# Altium PCB TYH-PD67W 2C1A 屏板0722.pcbdoc
Units mm, origin at the board's own origin, x right, y up, seen from the top; angles counter-clockwise.
Board outline 22.99 x 38.9 mm, 5 copper layers (Top Layer, Signal Layer 3, Signal Layer 1, Signal Layer 2, Bottom Layer), stack 0.941 mm thick; 41 components, 178 nets, 155 pads, 222 vias.
Unrouted connection lines stored in the file: 1.
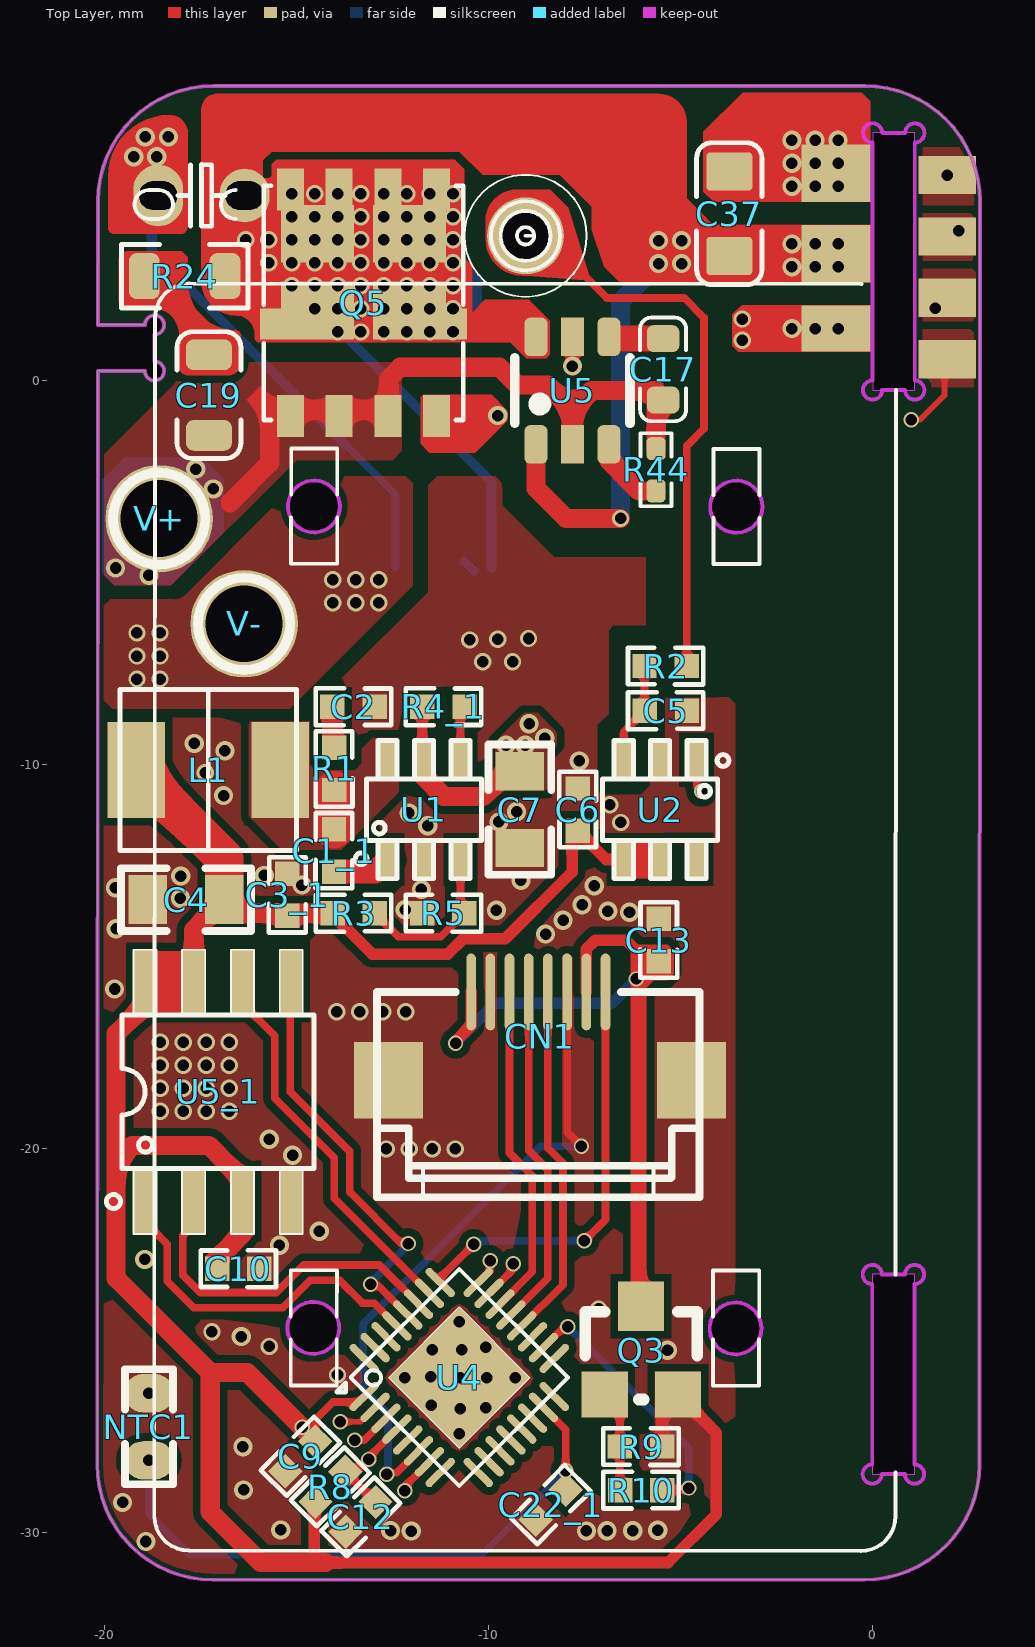
[diagram p0: Top Layer view]
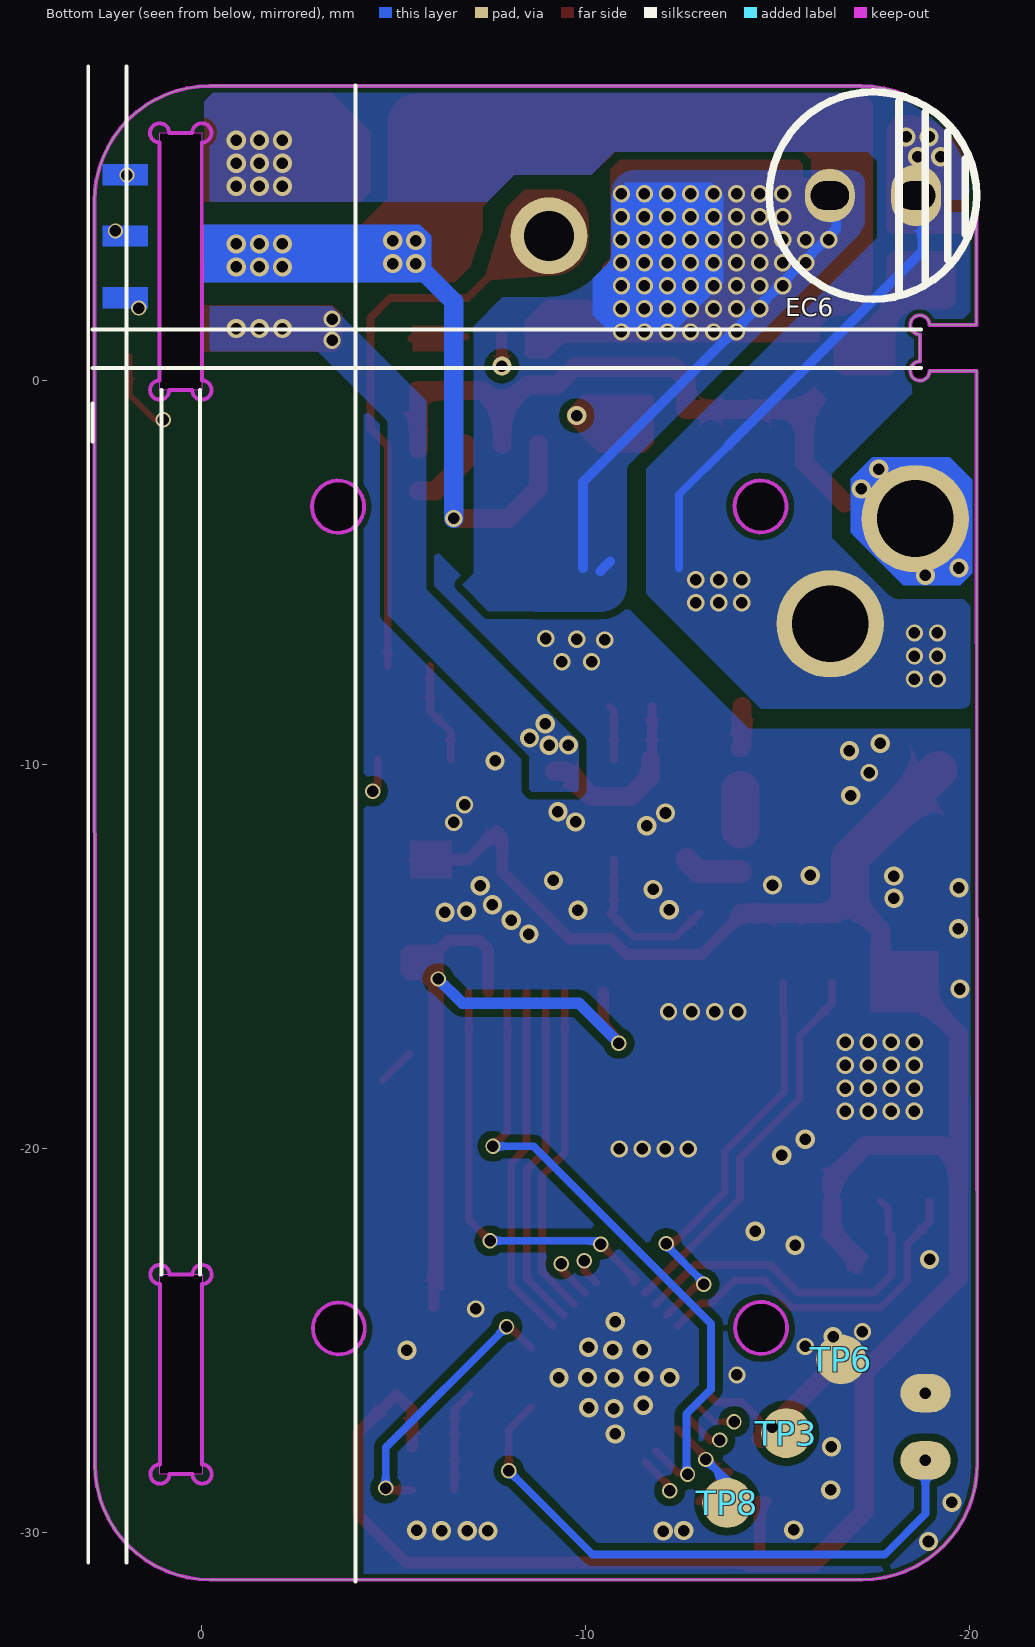
[diagram p1: Bottom Layer view, seen from below]
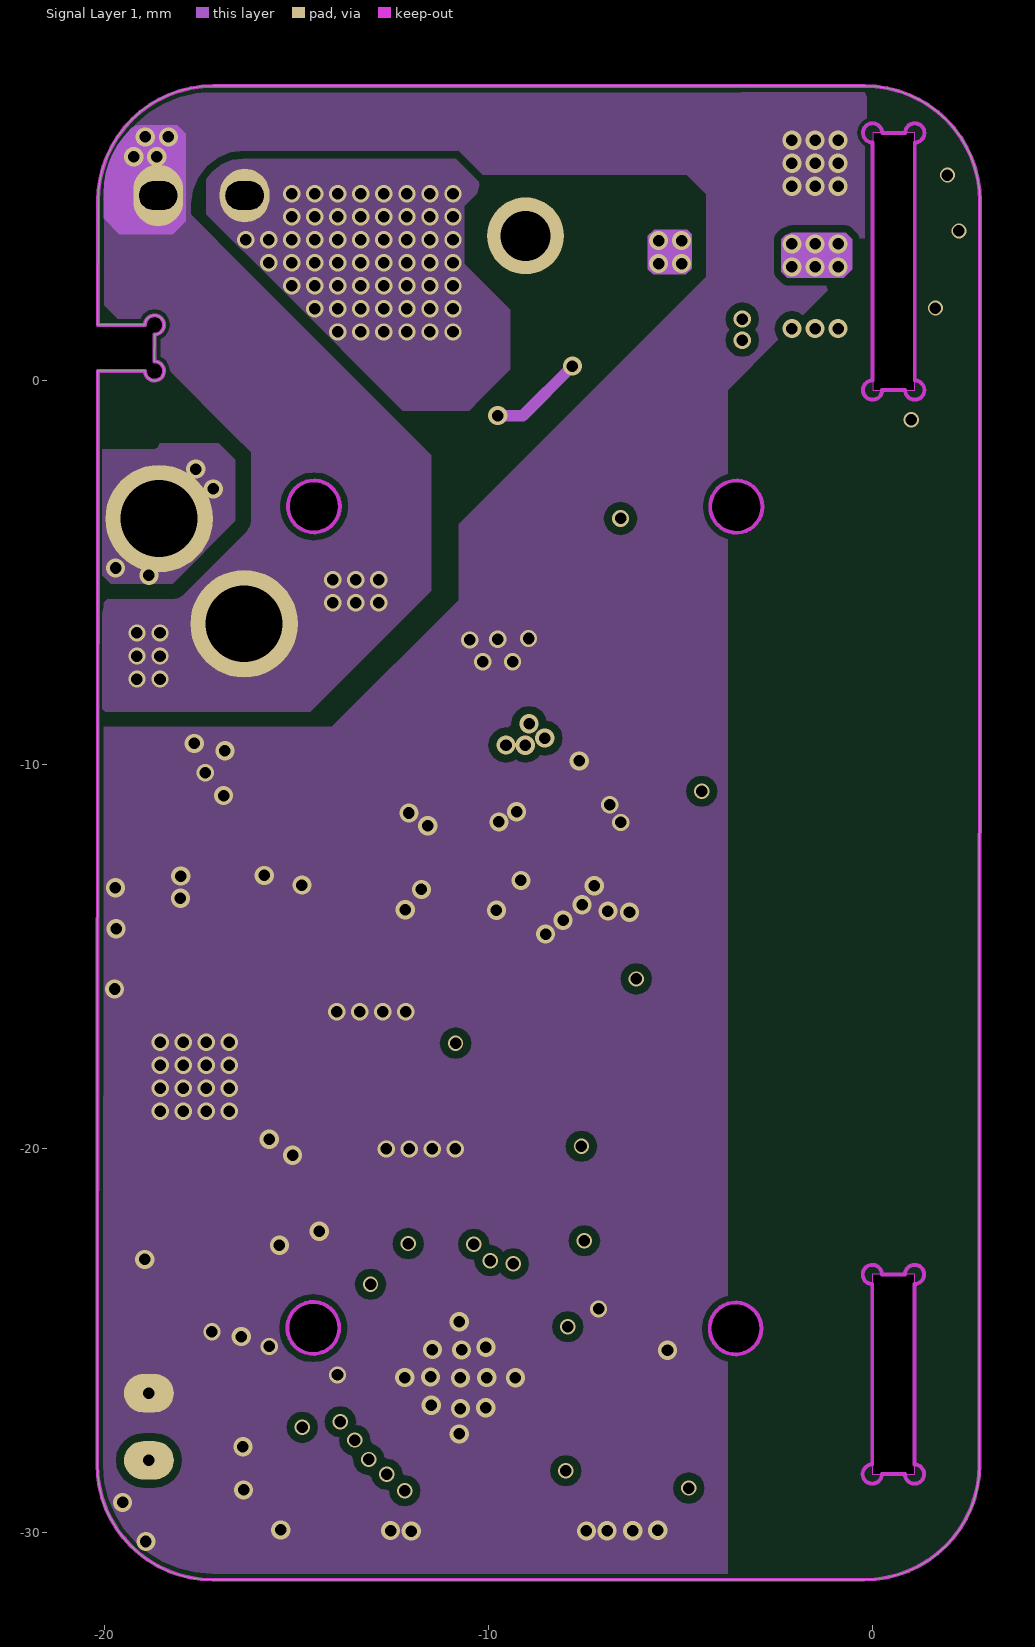
[diagram p2: Signal Layer 1]
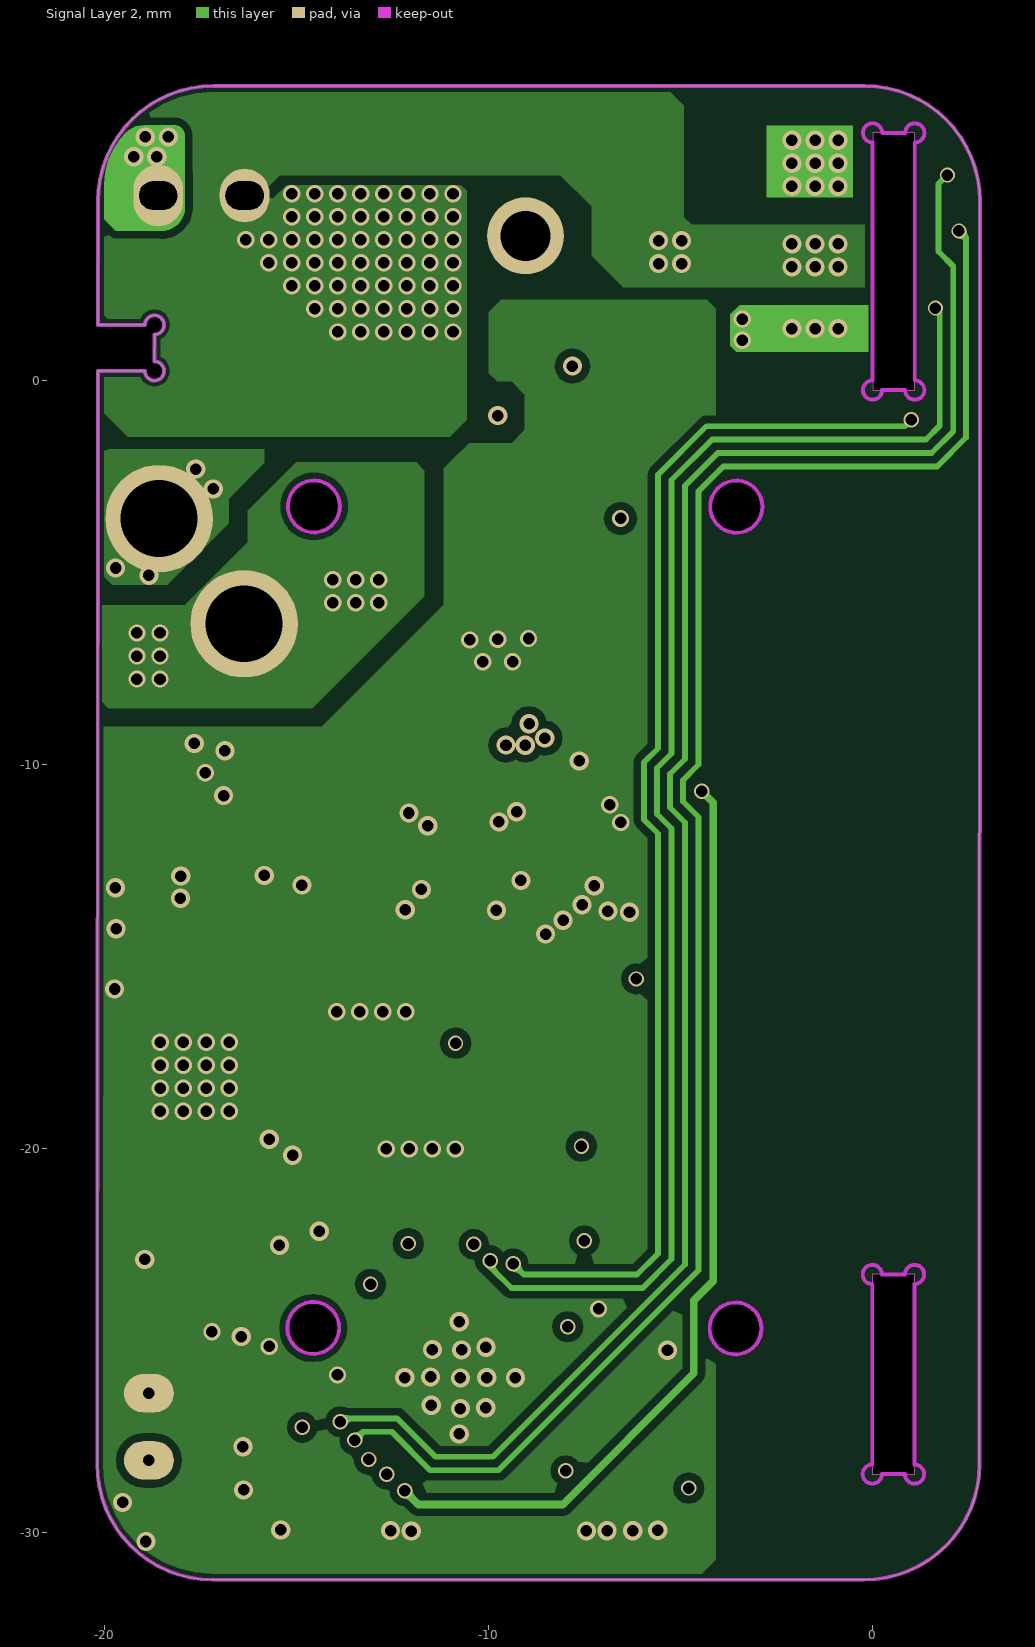
[diagram p3: Signal Layer 2]
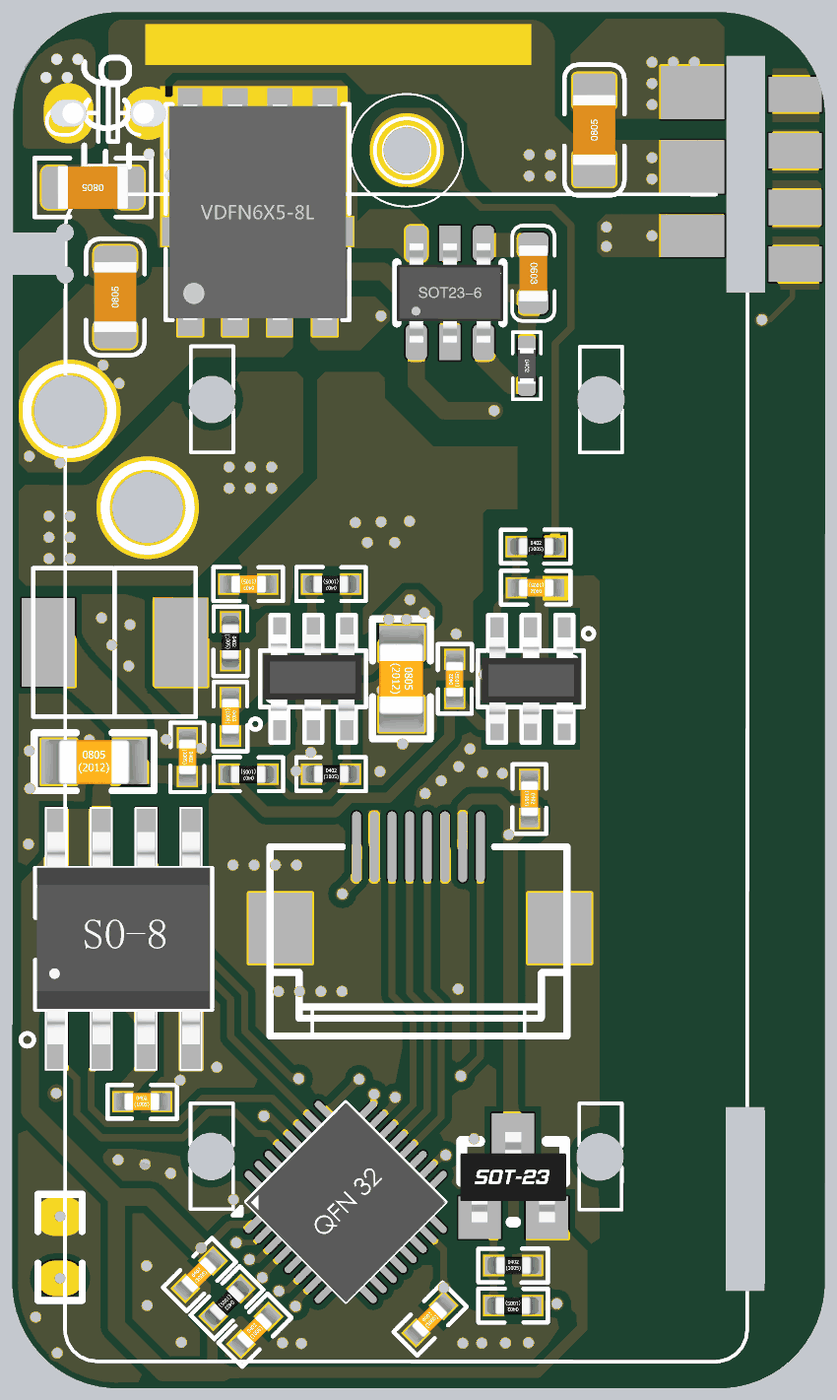
[diagram p4: 3D render of the assembled board from above, using the file's embedded part models]

## Layer stack, top to bottom
Top Solder: solder mask 0.0102, Solder Resist, Dk 3.5
Top Layer: signal copper 0.0356
Dielectric 1: core 0.254, FR-4, Dk 4.2
Signal Layer 3: signal copper 0.036
Dielectric 4: prepreg 0.127, Dk 4.2
Signal Layer 1: signal copper 0.036
Dielectric 2: core 0.254, Dk 4.2
Signal Layer 2: signal copper 0.036
Dielectric 3: prepreg 0.127, Dk 4.2
Bottom Layer: signal copper 0.0356
Bottom Solder: solder mask 0.0102, Solder Resist, Dk 3.5

## Board outline
-20.192,-28.232 ccw(c-17.192,-28.234) -17.192,-31.234 -0.214,-31.234 ccw(c-0.214,-28.234) 2.786,-28.235 2.798,4.669 ccw(c-0.202,4.67) -0.202,7.67 -17.171,7.67 ccw(c-17.171,4.67) -20.171,4.672 -20.173,1.447 -18.95,1.447 cw(c-18.7,1.447) -18.7,1.197 -18.7,0.497 cw(c-18.7,0.247) -18.95,0.247 -20.174,0.247
cut-out: 1.094,-23.283 -0.006,-23.283 -0.006,-28.483 1.094,-28.483
cut-out: 0.001,-0.25 1.101,-0.25 1.101,6.45 0.001,6.45
cut-out: -13.894,-24.676 -13.894,-24.675 ccw(c-14.561,-24.675) -14.561,-24.009 -14.571,-24.009 ccw(c-14.571,-24.673) -15.236,-24.673 -15.236,-24.702 ccw(c-14.584,-24.702) -14.584,-25.353 -14.571,-25.353 ccw(c-14.571,-24.676)
cut-out: -2.898,-24.69 -2.898,-24.689 ccw(c-3.565,-24.689) -3.565,-24.022 -3.575,-24.022 ccw(c-3.575,-24.687) -4.239,-24.687 -4.239,-24.715 ccw(c-3.588,-24.715) -3.588,-25.367 -3.575,-25.367 ccw(c-3.575,-24.69)
cut-out: -13.871,-3.273 -13.871,-3.272 ccw(c-14.537,-3.272) -14.537,-2.606 -14.547,-2.606 ccw(c-14.547,-3.27) -15.212,-3.27 -15.212,-3.299 ccw(c-14.56,-3.299) -14.56,-3.95 -14.548,-3.95 ccw(c-14.548,-3.273)
cut-out: -2.871,-3.279 -2.871,-3.278 ccw(c-3.537,-3.278) -3.537,-2.612 -3.547,-2.612 ccw(c-3.547,-3.276) -4.212,-3.276 -4.212,-3.305 ccw(c-3.56,-3.305) -3.56,-3.956 -3.548,-3.956 ccw(c-3.548,-3.279)

## Design rules (kind name [scope] priority, off if disabled: settings)
Clearance Clearance_22 [InNet('HV') vs InNet('SW')] p1: gap=1.2
Clearance Clearance_21 [InNet('NetRX3_2') vs InNet('PGND')] p2: gap=1.5
Clearance Clearance_20 [InNet('NetBD1_1') vs InNet('PGND')] p3: gap=1.5
Clearance Clearance_19 [InNet('NetC4_2') vs InNet('PGND')] p4: gap=0.4
Clearance Clearance_18 [InNet('NetR15_1') vs InNet('PGND')] p5: gap=1
Clearance Clearance_17 [InNet('NetN_1') vs InNet('NetBD1_1')] p6: gap=1.55
Clearance Clearance_16 [InNet('NetN_1') vs InNet('PGND')] p7: gap=1.5
Clearance Clearance_15 [InNet('VIN') vs InNet('PGND')] p8 off: gap=5.8
Clearance Clearance_14 [InNet('CS') vs InNet('Bais-L')] p9: gap=0.45
Clearance Clearance_13 [InNet('SW') vs InNet('CS')] p10: gap=1.5
Clearance Clearance_12 [InNet('NetR15_1') vs InNet('CS')] p11: gap=1
Clearance Clearance_11 [InNet('NetBD1_3') vs InNet('CS')] p12: gap=1.1
Clearance Clearance_10 [InNet('HV') vs InNet('CS')] p13: gap=1.1
Clearance Clearance_9 [InNet('NetL2_1') vs InNet('CS')] p14: gap=1.5
Clearance Clearance_8 [InNet('NetC1_2') vs InNet('PGND')] p15: gap=1.2
Clearance Clearance_7 [InNet('NetBD1_3') vs InNet('PGND')] p16: gap=1.2
Clearance Clearance_6 [InNet('NetC2_2') vs InNet('PGND')] p17: gap=1.3
Clearance Clearance_5 [InNet('Bais-L') vs InNet('PGND')] p18: gap=0.45
Clearance Clearance_4 [InNet('SW') vs InNet('PGND')] p19: gap=1.5
Clearance Clearance_3 [InNet('HV') vs InNet('PGND')] p20: gap=1.2
Clearance Clearance_2 [InNet('NetL2_1') vs InNet('PGND')] p21: gap=1.5
Clearance Clearance_1 [OnLayer('Keep-Out Layer')] p22: gap=0.1
Clearance [All] p23: gap=0.2
PlaneConnect [All] p1: planeconnectstyle=Direct reliefexpansion=0.508 reliefentries=4 reliefconductorwidth=0.3 reliefairgap=0.254
PolygonConnect [All] p1: connectstyle=Direct reliefconductorwidth=0.3 reliefentries=4 polygonreliefangle="90 Angle" airgapwidth=0.3
RoutingVias [All] p1: holewidth=0.711 width=1.27 viastyle="Through Hole" minholewidth=0.711 minwidth=1.27 maxholewidth=0.711 maxwidth=1.27
SolderMaskExpansion [All] p1: expansion=0.05
Width [All] p1: maxlimit=10 minlimit=0.1 preferedwidth=0.2
28 further rules are at their usual default settings.

## Components (designator, comment, footprint, x,y, rotation, side; value= is the part's Value field where it differs from the comment)
C1_1 "100nF" 0402C#1 -14.001,-12.224 r270 top (schematic designator C1)
C2 "1NF" 0402C#1 -13.499,-8.522 r180 top
C3_1 "100NF" 0402C#1 -15.218,-13.374 r270 top (schematic designator C3)
C4 "22uF" 0805C#1 -17.955,-13.505 r0 top
C5 "10PF" 0402C#2 -5.364,-8.624 r180 top
C6 "105P" 0402C#1 -7.701,-11.199 r90 top
C7 "10uF" 0805C#1 -9.169,-11.101 r270 top
C9 "100NF" 0402C#1 -14.935,-28.019 r45 top
C10 "105PF" 0402C#1 -16.539,-23.112 r0 top
C12 "100NF" 0402C#1 -13.364,-29.594 r45 top
C13 "105P" 0402C#1 -5.544,-14.553 r270 top
C17 "2.2nF/250V/0805" 0603CX -5.454,1.088 r270 top (schematic designator C10)
C19 "2.2nF/250V/0805" 0805CX -17.282,-1.432 r90 top (schematic designator C10)
C22_1 "100NF" 0402C#1 -8.41,-29.279 r45 top (schematic designator C22)
C37 "2.2nF/250V/0805" 0805C#2 -4.58,2.492 r90 top (schematic designator C10)
CN1 "8.07A0.006200" "70W 屏座" -8.756,-16.05 r270 top locked
EC6 "560uF/25V/6.3*16" EG-5*17L -17.478,4.815 r90 bottom
L1 "4.7uH" 电感0420 -17.301,-10.146 r180 top
NTC1 "100K" NTC1 -18.845,-27.286 r90 top
Q3 "APM2301" SOT23-MOS -6.109,-25.751 r0 top
Q5 "Comment" DFN5*6 -15.163,-0.929 r0 top
R1 "2R" 0402R#1 -14,-10.094 r270 top
R2 "0R" 0402R#2 -5.408,-7.414 r0 top
R3 "47k" 0402R#1 -13.491,-13.898 r180 top
R4_1 "100k" 0402R#1 -11.155,-8.522 r180 top (schematic designator R4)
R5 "12k" 0402R#1 -11.199,-13.849 r0 top
R8 "10k" 0402R#1 -14.089,-28.812 r225 top
R9 "100K" 0402R#1 -6.048,-27.741 r0 top
R10 "1K" 0402R#1 -6.004,-28.921 r180 top
R24 "10R/1206" 0805RX -16.865,2.715 r180 top (schematic designator R6)
R44 "51R/0402" 0402R#3 -5.639,-1.776 r270 top (schematic designator R9)
TP3 "V3V" 焊盘1.5*2.5mm -15.218,-27.415 r180 bottom
TP6 "GND" 焊盘1.5*2.5mm -16.647,-25.494 r180 bottom
TP8 "RST" 焊盘1.5*2.5mm -13.681,-29.234 r180 bottom
U1 "ME3121" SOT23-6 -11.668,-11.179 r90 top
U2 "HD9210" SOT23-6 -5.544,-11.174 r270 top
U4 "PY32F032" "QFN32 4*4" -13.237,-26.462 r315 top
U5 "Comment" SOT-23-6S -8.766,-1.664 r90 top
U5_1 "P25Q64H-SUH-IT" SOP8 -17.119,-18.501 r90 top (schematic designator U5)
V+ "Comment" PAD-AC -18.58,-3.598 r0 top
V- "Comment" PAD-AC -16.366,-6.338 r0 top

## Footprints (in the part's own frame and the unit in brackets; to place one, negate y for a bottom-side part, rotate by r counter-clockwise, add the part's x,y. Pads: shape width x height; smd on the part's side, far side on the other; paste and mask are expansions set on the pad)
"70W 屏座" [mm]
  oval 2x0.25 smd: 1(-0.124,-1.698) 2(-0.124,-1.198) 3(-0.124,-0.698) 4(-0.124,-0.198) 5(-0.124,0.302) 6(-0.124,0.802) 7(-0.124,1.302) 8(-0.124,1.802)
  rect 2x1.8 smd: 2(2.176,-3.855) 2(2.176,4.045)
  silkscreen extent -0.12,-4.15 5.23,4.25
0402C#1 [mm]
  rect 0.635x0.635 smd paste-0.067 mask-0.018: 1(-0.531,-0.023) 2(0.571,-0.023)
  silkscreen extent -0.96,-0.51 1,0.46, body extent -0.72,-0.27 0.74,0.23, height 0.51
0402C#2 [mm]
  rect 0.635x0.635 smd paste-0.067: 1(-0.531,-0.023)
  rect 0.635x0.635 smd paste-0.067 mask-0.018: 2(0.571,-0.023)
  silkscreen extent -0.96,-0.51 1,0.46, body extent -0.72,-0.27 0.74,0.23, height 0.51
0402R#1 [mm]
  rect 0.635x0.635 smd paste-0.067 mask-0.018: 1(-0.531,-0.023) 2(0.571,-0.023)
  silkscreen extent -0.96,-0.51 1,0.46, body extent -0.7,-0.27 0.76,0.23, height 0.51
0402R#2 [mm]
  rect 0.635x0.635 smd paste-0.067 mask-0.018: 1(-0.531,-0.023)
  rect 0.635x0.635 smd paste-0.067: 2(0.571,-0.023)
  silkscreen extent -0.96,-0.51 1,0.46, body extent -0.7,-0.27 0.76,0.23, height 0.51
0402R#3 [mm]
  rrect50% 0.6x0.5 smd: 1(0,0) 2(1.1,0)
  silkscreen extent -0.4,-0.4 1.5,0.4, body extent 0.05,-0.25 1.05,0.25, height 0.3
0603CX [mm]
  rrect50% 0.7x0.85 smd: 1(0,0) 2(1.6,0)
  silkscreen extent -0.55,-0.6 2.15,0.6, body extent 0,-0.41 1.6,0.41, height 0.81
0805C#1 [mm]
  rect 1x1.27 smd: 1(-0.924,-0.016) 2(1.076,-0.016)
  silkscreen extent -1.62,-0.83 1.77,0.8, body extent -1.33,-0.65 1.48,0.6, height 0.8
0805C#2 [mm]
  rrect20% 1x1.2 smd: 1(0.75,-0.85) 2(2.95,-0.85)
  silkscreen extent 0,-1.7 3.7,0, body extent 0.85,-1.46 2.85,-0.24, height 0.51
0805CX [mm]
  rrect50% 0.8x1.2 smd: 1(0,0) 2(2.1,0)
  silkscreen extent -0.6,-0.83 2.7,0.83, body extent 0.05,-0.61 2.05,0.61, height 0.51
0805RX [mm]
  rrect50% 0.8x1.2 smd: 1(0,0) 2(2.1,0)
  silkscreen extent -0.6,-0.83 2.7,0.83, body extent 0.05,-0.61 2.05,0.61, height 0.51
DFN5*6 [mm]
  rect 0.7x1.1 smd: 1(0,0) 2(1.27,0) 3(2.54,0) 4(3.81,0) 5(3.81,5.9) 6(2.54,5.9) 7(1.27,5.9) 8(0,5.9)
  rect 1x0.8 smd: 8(-0.295,2.402) 8(4.105,2.402)
  rect 1.9x1.5 smd: 8(0.705,2.75) 8(0.705,4.75) 8(3.105,2.75) 8(3.105,4.75)
  silkscreen extent -0.69,-0.1 4.51,6, body extent -0.59,-0.1 4.41,6, height 1.06
EG-5*17L [mm]
  oval 1.4x1.3 hole 0.75 slot 1 at 90 deg: 1(0,1.125)
  oval 1.6x1.3 hole 0.75 slot 1 at 90 deg: 2(0,-1.125)
  silkscreen extent -2.7,-2.7 2.7,2.7, body extent -2.7,-2.7 2.7,2.7, height 17
NTC1 [mm]
  oval 1x1.3 hole 0.3: 1(-0.84,0) 2(0.91,0)
  silkscreen extent -1.47,-0.63 1.53,0.62
PAD-AC [mm]
  round 2.8 hole 2: 1(0,0)
  silkscreen extent -1.2,-1.2 1.2,1.2
"QFN32 4*4" [mm]
  oval 0.2x1 smd: 1(0,0) 2(0.4,0) 3(0.8,0) 4(1.2,0) 5(1.6,0) 6(2,0) 7(2.4,0) 8(2.8,0) 17(2.8,4.2) 18(2.4,4.2) 19(2,4.2) 20(1.6,4.2) 21(1.2,4.2) 22(0.8,4.2) 23(0.4,4.2) 24(0,4.2)
  oval 1x0.2 smd: 9(3.5,0.7) 10(3.5,1.1) 11(3.5,1.5) 12(3.5,1.9) 13(3.5,2.3) 14(3.5,2.7) 15(3.5,3.1) 16(3.5,3.5) 25(-0.7,3.5) 26(-0.7,3.1) 27(-0.7,2.7) 28(-0.7,2.3) 29(-0.7,1.9) 30(-0.7,1.5) 31(-0.7,1.1) 32(-0.7,0.7)
  rect 2.6x2.6 smd: 33(1.4,2.1)
  silkscreen extent -0.6,-0.42 3.4,4.1, body extent -0.59,0.09 3.41,4.09, height 0.57
SOP8 [mm]
  rect 1.7x0.6 smd: 1(-2.875,1.83) 2(-2.875,0.56) 3(-2.875,-0.71) 4(-2.875,-1.98) 5(2.825,-1.98) 6(2.825,-0.71) 7(2.825,0.56) 8(2.825,1.83)
  silkscreen extent -3.73,-2.58 3.68,2.83, body extent -3.01,-2.52 2.99,2.38, height 1.7
SOT23-6 [mm]
  rect 1x0.5 smd: 1(-1.298,0.964) 2(-1.298,0.014) 3(-1.298,-0.936) 4(1.302,-0.936) 5(1.302,0.014) 6(1.302,0.964)
  silkscreen extent -1.8,-1.49 1.8,1.8, body extent -1.16,-1.37 1.26,1.43, height 1.09
SOT23-MOS [mm]
  rect 1.2x1.3 smd: D(0.075,1.64)
  rect 1.2x1.2 smd: G(-0.865,-0.66) S(1.04,-0.66)
  silkscreen extent -1.37,-0.79 1.55,1.5, body extent -1.41,-0.79 1.59,1.76, height 1
SOT-23-6S [mm]
  rrect50% 1x0.6 smd: 1(0,0) 3(0,-1.9) 4(2.8,-1.9) 6(2.8,0)
  rect 1x0.6 smd: 2(0,-0.95) 5(2.8,-0.95)
  silkscreen extent 0.55,-2.45 2.25,0.55, body extent -0.01,-2.45 2.8,0.55, height 1.15
焊盘1.5*2.5mm [mm]
  round 1.3 smd: 1(0,0)
电感0420 [mm]
  rect 1.5x2.5 smd: 1(-1.875,0) 2(1.875,0)
  silkscreen extent -2.3,-2.1 2.3,2.1

## Part data
C1_1: library part 22nF, "贴片电容：100NF/25V-X7R-0402"
C2: library part C0402, "贴片电容：1NF/50V-X7R-0402"
C3_1 C9: library part 0.1u, "贴片电容：100NF/10V-X5R-0402"
C4: "贴片电容：22UF/10V-X7R-0805"
C5: library part CAP, "贴片电容：10PF/10V-X5R-0402"
C6 C13: library part CAP, "贴片电容：105P/10V-X5R-0402"
C7: "贴片电容：10UF/35V-X7R-0805"
C10: library part 0.1u, "贴片电容：105P/10V-X5R-0402"
C12 C22_1: library part 10uF, "贴片电容：100NF/10V-X7R-0805"
C17 C19 C37: library part CAP
EC6: library part CAPACITOR, "C?"
L1: "贴片电感：0420-4.7UH"
NTC1: library part RES_0603, "贴片NTC:100K-3950"
Q3: library part MOS_P, "贴片MOS：APM2301-SOT23-3"
R1: library part R0402, "贴片电阻：2R-0402-F"
R2: library part R, "贴片电阻：0R-0402-F"
R3: library part 75k, "贴片电阻：47K-0402-1%"
R4_1: "贴片电阻：100K-0402-1%"
R5: library part 10k, "贴片电阻：12K-0402-1%"
R8: "贴片电阻：10K-0402-F"
R9: library part R, "贴片电阻：100K-0402-F"
R10: library part R, "贴片电阻：1K-0402-F"
R24 R44: library part Res1, "Resistor"
TP3 TP6 TP8: library part TP
U1: library part TD8113, "贴片IC：ME3121-SOT23-6"
U2: library part SOT23-MCU, "贴片触摸：HD9210-SOT23-6"
U4: library part PY32F031, "贴片IC：PY32F032-QFN32-4*4"

## Free pads (board coordinates)
  round 2 hole 1.3: 0(-9.037,3.767)
  rect 1.8x1.2 smd: 3(-0.949,1.35)
  rect 1.8x1.5 smd: 3(-0.949,3.3) 3(-0.949,5.4)
  rect 1.5x1 smd: 3(1.951,0.55) 3(1.951,2.15) 3(1.951,3.75) 3(1.951,5.35)

## Via types
v1: diameter 0.45, hole 0.3, Top Layer to Bottom Layer, tented both sides, 107 vias
v2: diameter 0.5, hole 0.3, Top Layer to Bottom Layer, tented both sides, 92 vias
v3: diameter 0.4, hole 0.3, Top Layer to Bottom Layer, tented both sides, 23 vias

## Nets (pads, with @x,y where several pads share a name; then routed paths per layer and width w, separated by ;. In a path a pad name is that pad's centre, name@x,y a point inside that pad or via, vN(x,y) a via of type N, cw(c..) or ccw(c..) an arc to the next point about the centre after c; other vN are vias at no path point)
3.3V: 
A: 
A+: 
A-: 
BACK_LED: U4.19
Bais-L: 
BOOT0: U4.31
BUTTON: U2.1 U4.7 | length 26.5
  Top Layer w0.2: v3(-12.183,-28.918) -12.145,-28.879 -12.145,-28.763 -11.823,-28.442 U4.7 ; U2.1 -4.58,-10.564 v3(-4.447,-10.696)
  Signal Layer 2 w0.2: v3(-12.183,-28.918) -11.824,-29.276 -8.073,-29.276 -4.655,-25.859 -4.655,-23.961 -4.148,-23.454 -4.148,-10.995 v3(-4.447,-10.696)
CC1: 
CC2: 
CPA: 
CS: 
D: 
D25_INT: C22_1.2 NTC1.1 U4.15 | length 15.5
  Top Layer w0.2: U4.15 -7.99,-27.326 v3(-7.99,-28.393)
  Bottom Layer w0.2: NTC1.1 -18.845,-29.513 -17.779,-30.579 -10.175,-30.579 v3(-7.99,-28.393)
D31_EN1: U4.11
D31_EN2: U4.10
D31_INT1: U4.13
D+: 
D-: 
DM: 
DP: 
EM: 
EN: 
EN_IC: 
FB: 
FLASH_CLK: U4.26 U5_1.6 | length 10.1
  Top Layer w0.2: U5_1.6 -16.409,-16.226 -15.569,-17.066 -15.569,-18.694 -14.016,-20.247 -14.016,-21.299 U4.26
FLASH_CS: U4.29 U5_1.1 | length 9.4
  Top Layer w0.2: U5_1.1 -18.949,-21.914 -18.367,-22.496 -18.367,-23.462 -17.677,-24.152 -15.36,-24.152 -14.644,-23.436 -13.881,-23.436 -13.281,-24.036 -12.977,-24.036 U4.29
FLASH_MISO: U4.27 U5_1.2 | length 9.1
  Top Layer w0.2: U5_1.2 -17.879,-21.576 -17.879,-22.181 -17.967,-22.269 -17.967,-23.296 -17.511,-23.752 -15.526,-23.752 -14.809,-23.036 -12.845,-23.036 U4.27
FLASH_MOSI: U4.28 U5_1.5 | length 11
  Top Layer w0.2: U5_1.5 -15.139,-16.526 -15.169,-16.555 -15.169,-18.529 -13.616,-20.081 -13.616,-21.133 -12.271,-22.478 v3(-12.091,-22.478) ; v3(-13.074,-23.536) -12.911,-23.536 U4.28
  Bottom Layer w0.2: v3(-13.074,-23.536) -13.074,-23.498 -12.091,-22.516 v3(-12.091,-22.478)
G-SR: Q5.4 U5.5 | length 4.9
  Top Layer w0.3: Q5.4@-11.33,-0.759 -9.92,-0.759 v2(-9.763,-0.916) ; v2(-7.816,0.375) U5.5
  Signal Layer 1 w0.3: v2(-9.763,-0.916) -9.107,-0.916 v2(-7.816,0.375)
GND-C: 
HV: 
ISET: 
KEY: 
KEY1: 
LCD_CS: CN1.8 U4.25 | length 11.1
  Top Layer w0.2: U4.25 -11.329,-23.421 -11.306,-23.421 v3(-10.384,-22.498) ; v3(-7.505,-22.404) -6.954,-21.853 CN1.8
  Bottom Layer w0.2: v3(-10.384,-22.498) -10.33,-22.498 -10.236,-22.404 v3(-7.505,-22.404)
LCD_DC: CN1.4 U4.21 | length 9
  Top Layer w0.2: U4.21 -8.46,-23.381 -8.46,-20.549 -8.954,-20.054 CN1.4
LCD_EN2: R10.1 U4.18 | length 7.1
  Top Layer w0.2: U4.18 -8.024,-24.643 v3(-7.935,-24.643) ; R10.1 -4.841,-28.898 v3(-4.788,-28.846)
  Bottom Layer w0.2: v3(-7.935,-24.643) -4.788,-27.79 v3(-4.788,-28.846)
LCD_MOSI: CN1.5 U4.20 | length 9.3
  Top Layer w0.2: U4.20 -8.06,-23.547 -8.06,-20.383 -8.454,-19.988 CN1.5
LCD_RES: CN1.3 U4.22 | length 8.7
  Top Layer w0.2: U4.22 -8.86,-23.216 -8.86,-20.714 -9.454,-20.12 CN1.3
LCD_TE: U4.17
LEDA: 
M: 
N: 
NetBD1_1: 
NetBD1_3: 
NetBD2_1: 
NetC1_1: C1_1.1 L1.1 R1.2 U1.6 | length 1
  Top Layer w1: C1_1.1 R1.2@-14.024,-10.666
NetC1_2: C1_1.2 U1.1 | length 1.5
  Top Layer w0.6: C1_1.2 -12.95,-12.794 U1.1
NetC2_2: C2.2 R1.1 | length 1.1
  Top Layer w0.5: C2.2 -14.07,-9.517 R1.1
NetC3_2: 
NetC4_1: 
NetC4_2: 
NetC5_2: C5.2 R2.1 U2.3 | length 2.7
  Top Layer w0.2: U2.3 -6.48,-9.146 C5.2 -5.939,-8.596 R2.1
NetC6_1: 
NetC10_2: C19.2 R24.2 | length 2.9
  Top Layer w0.2: R24.2@-18.973,2.618 -18.533,2.618 -17.282,1.367 C19.2
NetC21_1: 
NetC22_1: 
NetC24_1: 
NetC25_2: 
NetC26_2: 
NetC30_2: 
NetC31_2: 
NetC100_2: 
NetC101_1: 
NetC101_2: 
NetC112_1: 
NetD4_K: 
NetF1_1: 
NetF1_2: 
NetKEY1_1: pad.0 R2.2 | length 14.8
  Top Layer w0.2: pad.0 -8.543,3.767 -6.926,2.15 -4.904,2.15 -4.391,1.636 -4.391,-1.259 -4.837,-1.706 R2.2
NetL2_1: 
NetLF1_2: 
NetN_1: 
NetNTC2_1: 
NetQ1_3: 
NetQ3_4: 
NetQ3_G: Q3.G R9.1 R10.2 | length 2.7
  Top Layer w0.2: Q3.G -6.579,-26.806 R9.1 -6.579,-28.894 R10.2
NetR3_1: R3.1 R5.2 U1.3 | length 4.3
  Top Layer w0.2: R3.1 -12.346,-14.489 -11.246,-14.489 R5.2 -10.733,-13.768 U1.3
NetR4_1: R4_1.1 U1.4 | length 1.4
  Top Layer w0.2: U1.4 -10.733,-8.607 R4_1.1
NetR15_1: 
NetR25_2: 
NetR29_1: 
NetR31_2: 
NetR32_2: 
NetR41_2: 
NetR42_2: 
NetR134_1: 
NetRX1_2: 
NetRX3_2: 
NetU1_26: 
NetU1_27: 
NetU1_28: 
NetU1_29: 
NetU1_30: 
NetU1_32: 
NewNet1: 
NewNet2: 
NewNet3: 
NewNet4: 
NewNet5: 
NewNet6: 
NewNet7: 
NewNet8: 
NewNet9: 
NewNet10: 
NewNet11: 
NewNet12: 
NewNet13: 
NewNet14: 
NewNet15: 
NewNet16: 
NewNet18: 
NewNet22: 
NewNet23: 
NewNet24: 
NewNet25: 
NewNet28: 
NewNet32: 
NewNet33: 
NewNet34: 
NewNet36: 
NewNet38: 
NewNet40: 
NewNet41: 
NewNet42: 
OPTO: 
OTP: 
PA2: 
PA4: 
PA5: 
PA6: 
PA7: 
PA8: 
PA9: 
PB0: 
PB1: 
PB7: U4.30
PF0: 
PF1: 
PF3: U4.5
PGND: 
RS: 
RST: C12.2 R8.1 TP8.1 U4.4 | length 4.1
  Top Layer w0.2: C12.2 R8.1 -13.499,-28.42 U4.4
  Bottom Layer w0.2: TP8.1@-13.662,-29.027 -13.662,-28.644 v3(-13.119,-28.101)
RX: U4.9
SCL: pad.3@1.951,3.75 U4.3 | length 46.3
  Top Layer w0.2: v3(-13.483,-27.596) -13.24,-27.596 U4.3
  Signal Layer 2 w0.15: v3(-13.483,-27.596) -13.268,-27.381 -12.522,-27.381 -11.523,-28.38 -9.741,-28.38 -4.533,-23.172 -4.533,-11.373 -4.938,-10.967 -4.938,-10.41 -4.533,-10.005 -4.533,-2.886 -3.886,-2.239 1.683,-2.239 2.434,-1.489 2.434,3.711 v3(2.251,3.894)
SCL1: CN1.6 U4.6 | length 17.1
  Top Layer w0.2: v3(-12.648,-28.488) -12.61,-28.449 -12.396,-28.449 U4.6 ; CN1.6 -7.954,-19.573 v3(-7.581,-19.946)
  Bottom Layer w0.2: v3@-12.649,-28.562 -12.649,-28.48 -12.619,-28.45 -12.619,-26.918 -13.259,-26.278 -13.259,-24.57 -8.636,-19.946 v3(-7.581,-19.946)
SDA: pad.3@1.951,5.35 U4.2 | length 48.1
  Top Layer w0.15: v3(-13.859,-27.121) -13.344,-27.121 -12.968,-26.745 U4.2
  Top Layer w0.2: pad.3@1.951,5.356 2.062,5.245 pad.3@2.382,5.245
  Signal Layer 2 w0.15: v3(-13.859,-27.121) -13.77,-27.031 -12.377,-27.031 -11.378,-28.03 -9.886,-28.03 -4.883,-23.027 -4.883,-11.509 -5.272,-11.12 -5.272,-10.247 -4.883,-9.858 -4.883,-2.741 -4.031,-1.889 1.539,-1.889 2.101,-1.327 2.101,2.976 1.721,3.355 1.721,5.12 v3(1.951,5.35)
SDA1: 
SET: R44.2 U5.3 | length 2
  Top Layer w0.5: U5.3 -6.866,-2.09 -6.079,-2.876 R44.2
SGND: C2.1 C3_1.1 C4.1 C5.1 C6.2 C7.2 C9.1 C10.2 C12.1 C13.1 C22_1.1 C37.2 CN1.2 EC6.2 NTC1.2 pad.3@-0.949,5.4 R5.1 TP6.1 U1.2 U2.2 U4.16 U4.33 U5_1.4 V-.1 | length 13.2
  Top Layer w0.2: CN1.2@-5.407,-17.53 CN1.2@-4.711,-18.226
  Bottom Layer w0.2: -13.707,-1.693 -12.424,-2.976 -12.424,-4.885
  Bottom Layer w0.254: EC6.2@-18.769,4.674 -18.769,3.368 -13.707,-1.693
  other v1: -13.934,-25.9 -15.714,-25.157 -17.203,-24.777 -7.135,-24.182 -12.666,-20.015 -12.066,-20.015 -11.466,-20.015 -10.866,-20.015 -18.553,-19.032 -17.953,-19.032 -17.353,-19.032 -16.753,-19.032 -18.553,-18.432 -17.953,-18.432 -17.353,-18.432 -16.753,-18.432 -18.553,-17.832 -17.953,-17.832 -17.353,-17.832 -16.753,-17.832 -18.553,-17.232 -17.953,-17.232 -17.353,-17.232 -16.753,-17.232 -13.953,-16.442 -13.353,-16.442 -12.753,-16.442 -12.153,-16.442 -6.558,-11.512 -6.842,-11.05 -17.38,-10.219 -19.157,-7.776 -18.557,-7.776 -10.149,-7.323 -9.376,-7.323 -19.157,-7.176 -18.557,-7.176 -10.491,-6.758 -9.763,-6.739 -8.958,-6.72 -19.157,-6.576 -18.557,-6.576 -14.06,-5.787 -13.46,-5.787 -12.86,-5.787 -14.06,-5.187 -13.46,-5.187 -12.86,-5.187
  other v2: -18.924,-30.238 -12.552,-29.953 -12.014,-29.967 -7.449,-29.962 -6.912,-29.958 -6.243,-29.956 -5.593,-29.945 -15.413,-29.937 -19.533,-29.219 -16.38,-28.893 -16.397,-27.772 -10.766,-27.436 -10.731,-26.777 -10.073,-26.756 -11.492,-26.688 -12.185,-25.968 -10.732,-25.979 -10.046,-25.969 -9.3,-25.974 -11.51,-25.951 -10.702,-25.249 -5.34,-25.259 -11.463,-25.239 -10.069,-25.18 -16.438,-24.9 -10.765,-24.515 -18.952,-22.893 -15.447,-22.524 -14.41,-22.157 -15.104,-20.176 -15.713,-19.763 -19.741,-15.849 -8.516,-14.418 -19.701,-14.279 -8.059,-14.059 -6.329,-13.851 -6.89,-13.821 -9.794,-13.797 -12.169,-13.782 -7.566,-13.657 -18.024,-13.486 -11.75,-13.256 -19.717,-13.212 -7.249,-13.157 -14.861,-13.141 -9.156,-13.02 -18.016,-12.907 -15.843,-12.89 -11.585,-11.598 -9.731,-11.496 -12.075,-11.265 -9.271,-11.231 -16.901,-10.812 -7.637,-9.907 -16.865,-9.645 -17.667,-9.454 -2.098,5.057 -1.498,5.057 -0.898,5.057 -2.098,5.657 -1.498,5.657 -0.898,5.657 -19.24,5.825 -18.64,5.825 -2.098,6.257 -1.498,6.257 -0.898,6.257 -18.939,6.342 -18.339,6.342
SRCG_A: 
SW: 
SW-SR: 
SWCLK: 
SWCLK1: pad.3@1.951,2.15 U4.24 | length 37.8
  Top Layer w0.15: pad.3@1.692,1.885 1.692,1.891 pad.3@1.951,2.15
  Top Layer w0.2: U4.24 -9.96,-23.184 v3(-9.96,-22.923)
  Signal Layer 2 w0.15: v3(-9.96,-22.923) -9.96,-23.08 -9.403,-23.637 -5.987,-23.637 -5.232,-22.882 -5.232,-11.668 -5.612,-11.289 -5.612,-10.096 -5.232,-9.717 -5.232,-2.596 -4.176,-1.539 1.394,-1.539 1.753,-1.18 1.753,1.773 v3(1.64,1.886)
SWCLK2: 
SWDIO: 
SWDIO1: pad.3@1.951,0.55 U4.23 | length 35.1
  Top Layer w0.15: v3(1.009,-1.025) 1.237,-1.025 1.876,-0.386 pad.3@1.876,0.625
  Top Layer w0.2: U4.23 -9.36,-23.15 v3(-9.36,-23.009)
  Signal Layer 2 w0.15: v3(-9.36,-23.009) -9.082,-23.287 -6.132,-23.287 -5.588,-22.743 -5.588,-11.802 -5.952,-11.439 -5.952,-9.945 -5.588,-9.582 -5.588,-2.457 -4.321,-1.19 0.844,-1.19 v3(1.009,-1.025)
SWDIO2: 
SWRST: 
TX: U4.8
TXD: 
U2-2: 
V3V3: 
VBUS: 
VC: 
VDD: C13.2 CN1.1 CN1.7 Q3.D | length 27
  Top Layer w0.3: v3@-10.882,-17.232 -10.454,-16.804 CN1.1 ; v3(-10.859,-17.257) v3@-10.858,-17.256 ; CN1.7 -7.454,-14.808 -7.222,-14.576 -6.421,-14.576 ; Q3.D -6.034,-22.659 ; v3@-6.034,-15.592 -6.034,-22.659 ; C13.2 -5.873,-15.124 -6.421,-14.576 ; -6.421,-14.576 -6.152,-14.845 v3(-6.152,-15.587) -6.152,-22.541 -6.034,-22.659
  Bottom Layer w0.3: v3(-10.859,-17.257) -9.823,-16.221 -6.786,-16.221 v3(-6.152,-15.587)
VDD1: C17.1 U5.4 | length 1.4
  Top Layer w0.2: U5.4 -5.503,1.136 C17.1
VDS: C17.2 C19.1 Q5.1 Q5.2 Q5.3 R44.1 U5.2 V+.1 | length 16.9
  Top Layer w0.5: -16.736,-3.184 -15.698,-2.146 -15.698,-0.759 -12.6,-0.759 -12.6,0.047 -12.301,0.346 -9.713,0.346 -9.246,-0.122 -8.455,-0.122 -7.816,-0.76 ; U5.2 -7.816,-0.76 ; R44.1 -5.639,-0.263 -5.64,-0.264 -7.319,-0.264 -7.816,-0.76
  other v2: -18.845,-5.07 -19.715,-4.884 -17.172,-2.825 -17.627,-2.307
VFB: 
VFB1: 
VIN: C37.1 EC6.1 pad.3@-0.949,3.3 Q5.5 Q5.6 Q5.7 Q5.8 R24.1 U5.1 U5.6 | length 38.9
  Top Layer w0.254: R24.1@-17.004,2.606 -17.004,4.189 EC6.1@-16.519,4.674 ; Q5.6@-12.6,5.141 -16.051,5.141 EC6.1@-16.519,4.674 ; Q5.8@-12.035,1.991 -12.035,3.991 -15.836,3.991 EC6.1@-16.519,4.674 ; Q5.8@-11.058,1.473 -9.103,1.473 U5.6@-8.766,1.136
  Top Layer w0.5: U5.1 -8.766,-2.805 -7.978,-3.593 v1(-6.562,-3.593)
  Bottom Layer w0.254: EC6.1@-16.519,4.674 -16.519,3.945 -9.924,-2.65 -9.924,-4.885 ; -10.632,-4.717 -10.382,-4.967
  Bottom Layer w0.5: v1(-6.562,-3.593) -6.562,2.052 v2(-5.572,3.042)
  other v1: -13.926,1.264 -13.326,1.264 -12.726,1.264 -12.126,1.264 -11.526,1.264 -10.926,1.264 -14.526,1.864 -13.926,1.864 -13.326,1.864 -12.726,1.864 -12.126,1.864 -11.526,1.864 -10.926,1.864 -15.126,2.464 -14.526,2.464 -13.926,2.464 -13.326,2.464 -12.726,2.464 -12.126,2.464 -11.526,2.464 -10.926,2.464 -15.726,3.064 -15.126,3.064 -14.526,3.064 -13.926,3.064 -13.326,3.064 -12.726,3.064 -12.126,3.064 -11.526,3.064 -10.926,3.064 -16.326,3.664 -15.726,3.664 -15.126,3.664 -14.526,3.664 -13.926,3.664 -13.326,3.664 -12.726,3.664 -12.126,3.664 -11.526,3.664 -10.926,3.664 -15.126,4.264 -14.526,4.264 -13.926,4.264 -13.326,4.264 -12.726,4.264 -12.126,4.264 -11.526,4.264 -10.926,4.264 -15.126,4.864 -14.526,4.864 -13.926,4.864 -13.326,4.864 -12.726,4.864 -12.126,4.864 -11.526,4.864 -10.926,4.864
  other v2: -2.098,2.957 -1.498,2.957 -0.898,2.957 -4.972,3.042 -2.098,3.557 -1.498,3.557 -0.898,3.557 -5.572,3.642 -4.972,3.642
VIN_3V: C3_1.2 C4.2 C6.1 C9.2 C10.1 L1.2 Q3.S R3.2 R8.2 R9.2 TP3.1 U2.4 U2.5 U4.1 U5_1.3 U5_1.7 U5_1.8 | length 69.8
  Top Layer w0.2: C9.2@-14.502,-27.488 -14.502,-27.056 -14.049,-26.603 -13.379,-26.603 U4.1
  Top Layer w0.3: C10.1 C10.1@-17.069,-22.872 ; U5_1.3 U5_1.3@-16.409,-21.049 ; R8.2@-14.68,-29.199 R8.2@-14.594,-29.285 ; -14.534,-30.708 -14.534,-29.225 R8.2 ; -14.249,-30.785 -5.324,-30.785 -4.073,-29.533 -4.073,-27.407 Q3.S -5.477,-26.819 R9.2 ; R3.2 -14.062,-13.903 -13.026,-14.939 -11.059,-14.939 -10.659,-14.539 -9.562,-14.539 -7.826,-12.803 -7.826,-11.878 C6.1 -6.931,-12.477 U2.4 U2.5
  Top Layer w0.5: U5_1.8@-18.933,-15.781 -18.933,-16.248 -19.699,-17.014 -19.699,-20.338 ; U5_1.8@-18.796,-15.676 U5_1.7 -17.679,-14.321 C4.2 -16.525,-13.875 R3.2 ; C10.1@-17.06,-22.872 -16.409,-22.222 U5_1.3 ; -17.046,-20.167 -16.399,-20.814 U5_1.3@-16.399,-21.049 ; -17.041,-20.161 -17.279,-19.923 -19.283,-19.923 -19.699,-20.338 ; C9.2@-14.566,-27.552 v3(-14.852,-27.266) -16.284,-25.834 -17.248,-25.834 ; -14.249,-30.785 -15.933,-30.785 -17.248,-29.469 -17.248,-25.834 ; -19.699,-20.338 -19.699,-23.384 -17.248,-25.834
  Top Layer w1: L1.2 -16.879,-12.442 C4.2
VMS: 
VOUT1: C7.1 pad.3@-0.949,1.35 R4_1.2 U1.5 | length 4.8
  Top Layer w0.254: R4_1.2 -11.726,-9.833 U1.5
  Top Layer w0.5: U1.5 -11.683,-10.324 -11.173,-10.833 -10.146,-10.833 -9.49,-10.177 C7.1
  other v1: -3.39,1.048 -3.39,1.598
  other v2: -9.546,-9.496 -9.044,-9.499 -8.536,-9.315 -8.944,-8.939 -2.098,1.35 -1.498,1.35 -0.898,1.35
VXO: 
XGND: 
pads on no net: U2.6 U4.12 U4.14 U4.32

## Polygon pours and split planes (outlines as drawn)
VOUT1 on Bottom Layer "VOUT1_L04_P115" (solid, remove dead copper, pour order 31): -0.091,1.938 -3.383,1.938 -5.844,-0.523 -5.844,-5.431 -9.817,-9.405 -9.817,-10.662 -9.762,-10.717 -8.597,-10.717 -8.523,-10.643 -8.523,-9.782 -4.837,-6.096 -4.837,-1.062 -3.011,0.764 -0.111,0.764 -0.111,1.933 -0.09,1.955
VIN on Bottom Layer "Bottom Layer-No Net" (solid, remove dead copper, pour order 28): -8.63,-6.011 -7.462,-6.011 -6.777,-5.326 -7.081,-5.021 -7.081,-4.806 -7.081,1.418 -7.562,1.899 -7.825,2.162 -9.029,2.162 -9.753,2.162 -10.425,2.834 cw(c-9.84,3.418) -10.667,3.418 -10.667,3.69 -10.667,4.796 ccw(c-11.02,4.796) -11.02,5.149 -16.858,5.149 ccw(c-16.858,4.742) -17.266,4.742 -17.266,4.169 ccw(c-16.761,4.169) -17.118,3.813 -11.129,-2.176 cw(c-11.274,-2.321) -11.069,-2.321 -11.069,-5.354 ccw(c-10.404,-5.354) -10.404,-6.019
VIN on Bottom Layer "Bottom Layer-No Net" (solid, remove dead copper, pour order 29): -10.377,-6.021 -8.64,-6.021 -7.969,-5.351 -7.969,1.118 -9.029,2.178 cw(c-9.029,3.8) -10.176,2.653 -10.249,2.725 -12.257,4.733 ccw(c-14.053,2.937) -14.053,5.477 -15.629,5.477 -16.898,5.477 ccw(c-16.898,5.113) -17.262,5.113 -17.262,4.16 ccw(c-16.77,4.16) -17.118,3.813 -11.186,-2.119 cw(c-11.914,-2.848) -10.884,-2.848 -10.884,-5.522 ccw(c-10.395,-5.522) -10.395,-6.011
SGND on Bottom Layer "SGND_L04_P128" (solid, remove dead copper, pour order 38): -4.215,-0.157 -4.215,-31.557 -19.22,-31.557 -20.231,-30.547 -20.231,-9.301 -19.996,-9.066 -14.237,-9.066 -11.04,-5.869 -10.776,-6.133 -7.798,-6.133 -5.875,-4.21 -5.875,-0.554
SGND on Bottom Layer "Bottom Layer-No Net" (solid, remove dead copper, pour order 48): -19.799,-8.546 -14.561,-8.546 -11.574,-5.559 -11.574,-2.3 -17.586,3.712 -17.586,5.71 -17.338,5.957 -10.756,5.957 -10.152,5.353 -8.148,5.353 -7.448,4.654 -0.065,4.654 -0.065,7.273 -0.284,7.492 -18.679,7.492 -20.031,6.14 -20.031,4.848 -19.883,4.7 -19.431,4.7 -19.296,4.566 -19.486,4.376 -19.842,4.376 -20.068,4.15 -20.068,1.235 -16.408,-2.425 -16.408,-4.098 -17.873,-5.563 cw(c-18.202,-5.234) -18.202,-5.699 -19.844,-5.699 ccw(c-19.844,-5.871) -20.015,-5.871 -20.015,-8.33 ccw(c-19.799,-8.33)
VIN on Bottom Layer "Bottom Layer-No Net" (solid, remove dead copper, pour order 49): -15.724,5.477 -11.278,5.477 cw(c-11.278,4.866) -10.667,4.866 -10.667,2.723 cw(c-10.926,2.723) -10.926,2.464 -15.279,2.464 -17.004,4.189 -16.939,4.254 -16.939,5.149 -16.611,5.477 -15.724,5.477
SWCLK1 on Top Layer "SWCLK1_L01_P133" (solid, remove dead copper, pour order 44): 0.993,2.913 2.913,2.913 2.868,2.868 2.868,1.303 2.771,1.4 0.949,1.4 0.949,2.922 0.931,2.939
SWDIO1 on Top Layer "SWDIO1_L01_P132" (solid, remove dead copper, pour order 43): 1.064,1.338 2.983,1.338 2.939,1.294 2.939,-0.272 2.842,-0.174 1.02,-0.174 1.02,1.347 1.002,1.365
SCL1 on Top Layer "SCL1_L01_P131" (solid, remove dead copper, pour order 41): -8.301,-14.704 -8.084,-14.922 -8.084,-22.593 -6.881,-22.593 -6.51,-22.222 -6.51,-14.867
VIN_3V on Top Layer "VIN_3V_L01_P118" (solid, remove dead copper, pour order 33): -5.804,-25.548 -6.39,-26.135 -6.39,-29.38 -4.308,-29.38 -4.083,-29.605 -4.083,-25.91 -4.504,-25.489
VOUT1 on Top Layer "VOUT1_L01_P116" (solid, remove dead copper, pour order 32): -9.069,-8.658 -9.821,-9.409 -9.821,-10.659 -9.789,-10.691 -8.545,-10.691 -8.476,-10.621 -8.476,-9.757 -8.224,-9.504 -8.224,-9.157 -8.722,-8.658
NetC1_1 on Top Layer "NETC1_1_L01_P114" (solid, remove dead copper, pour order 30): -16.251,-8.865 -16.251,-11.355 -15.384,-12.222 -13.837,-12.222 -12.344,-10.73 -12.344,-9.314 -12.333,-9.303 -13.014,-9.303 -13.302,-9.592 -13.302,-9.973 -13.474,-10.145 -14.517,-10.145 -14.651,-10.012 -14.651,-8.883 -14.643,-8.875 -16.219,-8.875 -16.235,-8.859
SCL on Top Layer "SDA_L01_P134" (solid, remove dead copper, pour order 45): 1.046,4.502 2.966,4.502 2.921,4.457 2.921,2.892 2.824,2.989 1.002,2.989 1.002,4.51 0.984,4.528
SDA on Top Layer "SCL_L01_P135" (solid, remove dead copper, pour order 47): 1.091,6.076 3.01,6.076 2.966,6.032 2.966,4.466 2.868,4.564 1.046,4.564 1.046,6.085 1.029,6.103
SGND on Top Layer "Bottom Layer-No Net" (solid, remove dead copper, pour order 42): -3.578,-31.045 -3.578,-4.27 ccw(c-3.613,-4.27) -3.613,-4.236 -7.771,-4.236 cw(c-7.771,-2.73) -8.835,-3.795 -9.438,-3.191 cw(c-8.888,-2.641) -9.667,-2.641 cw(c-9.667,-2.596) -9.698,-2.627 -9.832,-2.494 -14.454,-2.494 ccw(c-14.454,-3.372) -15.075,-2.751 -17.88,-5.556 cw(c-18.225,-5.211) -18.225,-5.699 -19.876,-5.699 ccw(c-19.876,-5.791) -19.941,-5.726 ccw(c-19.639,-6.028) -20.065,-6.028 -20.065,-6.095 -20.065,-28.694 ccw(c-17.525,-28.694) -17.525,-31.234 -17.192,-31.234 -3.767,-31.234 ccw(c-3.767,-31.045) -3.578,-31.045
VDS on Top Layer "Bottom Layer-No Net" (solid, remove dead copper, pour order 27): -19.75,-5.338 -18.262,-5.338 -15,-2.076 -12.501,-2.076 -12.255,-1.83 -12.255,0.317 -12.412,0.473 -16.305,0.473 -16.517,0.685 -16.517,1.09 -16.67,1.242 -17.969,1.242 -18.186,1.025 -18.186,-0.099 -20.07,-1.982 -20.07,-5.018
VDS on Signal Layer 1 "VDS_L02_P126" (solid, remove dead copper, pour order 37): -18.382,-1.642 -20.254,-1.642 -20.327,-1.715 -20.327,-4.81 -19.846,-5.291 -18.225,-5.291 -16.593,-3.66 -16.593,-2.06 -17.022,-1.631 -18.382,-1.631
SGND on Signal Layer 1 "SGND_L02_P125" (solid, remove dead copper, pour order 36): -16.311,-3.758 -16.311,-3.867 -18.011,-5.568 -19.946,-5.568 -20.055,-5.459 -20.055,-8.548 -19.977,-8.626 -14.641,-8.626 -11.489,-5.474 -11.489,-2.385 -11.895,-1.979 -15.702,-1.979 -16.311,-2.588 -16.311,-3.836 -16.326,-3.852
SGND on Signal Layer 1 "Bottom Layer-No Net" (solid, remove dead copper, pour order 50): -16.186,-2.463 -16.186,-1.868 -16.671,-1.382 -20.025,1.972 -20.025,4.222 -20.025,4.788 -19.464,5.349 -17.951,5.349 -17.889,5.287 -17.889,4.453 -16.226,2.791 -11.489,-1.946 -11.489,-2.385 -11.489,-5.474 -14.641,-8.626 -19.977,-8.626 -20.055,-8.548 -20.055,-5.823 -19.994,-5.761 -19.936,-5.704 -18.676,-5.704 -18.236,-5.704 ccw(c-18.236,-5.281) -17.936,-5.58 -16.305,-3.948 ccw(c-16.593,-3.66) -16.186,-3.66
SGND on Signal Layer 1 "Bottom Layer-No Net" (solid, remove dead copper, pour order 51): -17.739,4.072 -17.739,4.601 cw(c-16.363,4.601) -16.363,5.977 -10.776,5.977 -10.152,5.353 -4.837,5.353 -4.138,4.654 -2.916,5.876 -2.916,6.088 -2.916,7.259 -2.985,7.329 -3.148,7.492 -3.383,7.492 -18.369,7.492 -19.693,6.168 -19.693,4.095 -19.366,3.767 -19.36,3.761 -18.165,3.761
VIN on Signal Layer 1 "Bottom Layer-No Net" (solid, remove dead copper, pour order 52): -16.722,5.942 -10.741,5.942 -10.152,5.353 -10.152,5.008 -10.538,4.622 -10.627,4.533 -10.627,4.111 -10.627,3.037 -10.08,2.49 -9.429,1.839 -9.429,1.291 -9.429,0.288 -10.211,-0.494 -10.5,-0.784 -11.19,-0.784 -12.076,-0.784 -12.23,-0.784 -15.454,2.44 -17.346,4.332 -17.346,5.33 -17.346,5.514 -17.057,5.803
SGND on Signal Layer 1 "SGND_L02_P124" (solid, remove dead copper, pour order 35): -0.207,7.521 -3.399,7.521 -4.326,6.593 -4.326,2.7 -10.776,-3.75 -10.776,-5.72 -14.08,-9.024 -20.459,-9.024 -20.485,-9.05 -20.485,-30.692 -19.589,-31.588 -3.77,-31.588 -3.77,-0.253 -0.148,3.369 -0.148,7.529
SGND on Signal Layer 2 "SGND_L03_P129" (solid, remove dead copper, pour order 39): -11.676,-2.356 -11.676,-5.62 -14.589,-8.532 -19.901,-8.532 -20.173,-8.26 -20.173,-5.86 -17.917,-5.86 -16.269,-4.212 -16.269,-3.396 -15.005,-2.132 -11.884,-2.132 -11.708,-2.308
SGND on Signal Layer 2 "Bottom Layer-No Net" (solid, remove dead copper, pour order 46): -20.017,-9.024 -14.347,-9.024 -13.68,-8.358 -11.163,-5.841 -11.163,-4.462 -11.163,-2.286 -10.994,-2.118 -10.509,-1.633 -9.933,-1.633 -9.401,-1.633 -9.053,-1.285 -9.053,-0.369 -9.397,-0.025 -9.775,-0.025 -9.991,0.191 -9.991,1.778 -9.668,2.101 -4.319,2.101 -4.089,1.87 -4.089,1.518 -4.089,-30.708 -4.473,-31.092 -18.663,-31.092 -19.874,-29.882 -20.313,-29.442 -20.313,-28.529 -20.313,-9.32 -20.017,-9.024
VDS on Signal Layer 2 "VDS_L03_P130" (solid, remove dead copper, pour order 40): -20.125,-1.748 -20.125,-4.996 -19.805,-5.316 -18.365,-5.316 -16.765,-3.716 -16.765,-3.076 -15.837,-2.148 -15.837,-1.797 -19.884,-1.797 -20.061,-1.62
VIN on Signal Layer 2 "VIN_L03_P123" (solid, remove dead copper, pour order 34): -11.014,-1.464 -19.4,-1.464 -20.282,-0.582 -20.282,7.388 -19.277,8.393 -6.149,8.393 -4.91,7.154 -4.91,4.256 -4.707,4.053 -0.027,4.053 -0.015,4.041 -0.015,2.513 -0.098,2.43 -6.497,2.43 -7.317,3.25 -7.317,4.535 -8.128,5.346 -15.443,5.346 -15.848,4.942 -15.848,4.745 -15.601,4.745 -15.26,5.086 -10.724,5.086 -10.574,4.936 -10.574,-1.025

## Keep-outs
Keep-Out Layer:
  circle w0.1: c-14.549,-3.281 r0.676
  circle w0.1: c-3.547,-3.287 r0.68
  circle w0.1: c-14.565,-24.675 r0.676
  circle w0.1: c-3.568,-24.689 r0.675
  lines w0.1: -20.192,-28.232 ccw(c-17.192,-28.234) -17.192,-31.234 -0.214,-31.234 ccw(c-0.214,-28.234) 2.786,-28.235 2.798,4.669 ccw(c-0.202,4.67) -0.202,7.67 -17.171,7.67 ccw(c-17.171,4.67) -20.171,4.672 -20.173,1.447 -18.95,1.447 cw(c-18.7,1.447) -18.7,1.197 -18.7,0.497 cw(c-18.7,0.247) -18.95,0.247 -20.174,0.247 -20.192,-28.232 ; -0.007,-28.233 ccw(c-0.007,-28.483) 0.243,-28.483 0.843,-28.483 ccw(c1.093,-28.483) 1.093,-28.233 1.094,-23.533 ccw(c1.094,-23.283) 0.844,-23.283 0.244,-23.283 ccw(c-0.006,-23.283) -0.006,-23.533 -0.007,-28.233 ; 0,0 ccw(c0,-0.25) 0.25,-0.25 0.85,-0.25 ccw(c1.1,-0.25) 1.1,0 1.102,6.197 ccw(c1.102,6.447) 0.852,6.448 0.252,6.448 ccw(c0.002,6.448) 0.002,6.198 0,0

## Other copper
Top Layer:
  rectangle net VDD1: -6.748,0.748 -5.488,1.425
  rectangle net VIN_3V: -6.509,-12.972 -5.414,-11.98
  rectangle: -19.192,-16.457 -17.399,-14.854
  rectangle net VDD: -6.303,-23.719 -6.018,-22.103
  pour cut-out: -5.905,-3.336 -5.905,-8.181 -5.818,-8.268 -4.019,-8.268 -3.99,-8.239 -3.671,-8.239 -3.613,-8.181 -3.613,-4.236 -4.541,-3.307 -5.818,-3.307
  pour cut-out: -5.152,-6.38 -6.754,-6.38 -6.875,-6.501 -6.875,-8.679 -7.163,-8.967 -7.163,-10.667 -7.042,-10.789 -6.033,-10.789 -5.79,-10.546 -5.79,-9.407 -5.714,-9.332 -5.456,-9.332 -5.403,-9.385 -5.403,-7.138 -5.16,-6.896 -5.16,-6.402
  region net VOUT1: -0.066,1.96 -3.411,1.96 -3.652,1.719 -3.652,0.905 -3.496,0.748 -0.066,0.748
  region net VIN: -0.049,4.061 -5.675,4.061 -5.973,3.763 -5.973,2.767 -5.761,2.555 -0.049,2.555
  region net SGND: -0.065,4.654 -4.138,4.654 -4.403,4.919 -4.403,6.472 -3.383,7.492 -0.284,7.492 -0.059,7.267 -0.059,4.66
  region net VDD: -5.982,-15.913 -5.693,-15.624 -5.346,-15.624 -5.177,-15.455 -5.177,-14.85 -5.334,-14.693 -6.136,-14.693 -6.258,-14.816 -6.258,-15.803 -6.179,-15.883
  pour cut-out: -20.092,-8.254 -19.799,-8.546 -14.655,-8.546 -14.54,-8.661 -14.663,-8.785 -20.032,-8.785 -20.097,-8.72
  pour cut-out: -15.24,-8.614 -11.969,-5.343 -11.969,-2.678 -12.443,-2.204 -12.443,-2.086 -12.239,-1.883 -12.186,-1.883 -11.574,-2.494 -11.574,-5.516 -14.672,-8.614
  pour cut-out: -11.574,-2.494 -9.601,-2.494 -9.518,-2.578 -9.544,-2.604 -9.544,-3.036 -9.399,-3.036 -9.264,-2.901 -9.264,-2.397 -9.465,-2.197 -11.689,-2.197 -11.779,-2.287 -11.779,-2.293 -11.574,-2.498
  pour cut-out: -11.574,-2.726 -11.343,-2.494 -9.832,-2.494 -9.647,-2.679 -9.647,-3.247 -8.292,-4.602 -5.829,-4.602 -5.669,-4.443 -8.187,-4.443 -9.483,-3.147 -9.483,-2.613 -9.761,-2.334 -11.411,-2.334 -11.574,-2.498
  pour cut-out: -18.634,-16.726 -16.349,-16.726 -16.443,-16.631 -18.54,-16.631
  region net G-SR: -11.706,-0.374 -9.921,-0.374 -9.511,-0.784 -9.511,-1.048 -10.342,-1.879 -11.538,-1.879 -11.77,-1.648 -11.77,-0.437
  pour cut-out: -14.639,-14.452 cw(c-14.58,-14.452) -14.58,-14.393 -14.58,-14.374 ccw(c-14.6,-14.374) -14.6,-14.354 ccw(c-14.6,-14.436) -14.681,-14.436 -14.681,-14.626 -14.639,-14.626
  region net NetC10_2: -19.31,3.361 -17.988,3.361 -17.834,3.207 -17.834,2.551 ccw(c-16.592,2.551) -16.592,1.309 cw(c-16.592,1.169) -16.452,1.169 -16.452,0.455 cw(c-16.771,0.455) -16.771,0.135 -17.832,0.135 cw(c-17.832,0.361) -18.058,0.361 -18.058,1.212 ccw(c-18.7,1.212) -18.7,1.854 -19.384,1.854 cw(c-19.384,2.103) -19.632,2.103 -19.632,3.151 cw(c-19.422,3.151) -19.422,3.36
  region net VIN: -8.504,0.579 -9.018,0.579 -9.433,0.994 -15.976,0.994 cw(c-15.976,1.104) -16.086,1.104 -16.086,1.199 ccw(c-16.577,1.199) -16.577,1.69 cw(c-16.577,2.59) -17.478,2.59 -17.478,7.062 cw(c-17.074,7.062) -17.074,7.466 -5.571,7.466 cw(c-5.571,6.738) -4.843,6.738 -4.843,4.747 -3.777,3.681 -3.535,3.681 -3.535,2.689 -3.669,2.555 -6.586,2.555 -6.989,2.958 -7.318,3.925 -7.318,4.524 -8.148,5.353 -10.152,5.353 -10.761,5.962 -15.651,5.962 -15.876,5.738 -15.876,5.31 -15.772,5.206 -15.649,5.33 -15.649,5.632 -15.536,5.745 -10.877,5.745 -10.633,5.502 -10.633,3.189 -10.43,2.986 -10.43,1.762 -10.095,2.098 -8.957,2.098 -8.408,1.549 -8.408,0.675
  region net NetKEY1_1: -9.254,4.971 -8.391,4.971 -7.921,4.501 -7.334,2.597 -9.006,2.732 -9.128,2.732 cw(c-9.128,3.682) -10.077,3.682 -10.077,4.156 cw(c-9.262,4.156) -9.262,4.972
  region net SGND: -18.021,3.816 ccw(c-18.021,4.003) -17.834,4.003 -17.834,6.436 ccw(c-18.313,6.436) -18.313,6.915 ccw(c-18.313,5.32) -19.908,5.32 -19.908,3.981 ccw(c-19.743,3.981) -19.743,3.816
Signal Layer 1:
  region net VIN: -2.112,3.844 -0.7,3.844 -0.53,3.674 -0.53,2.9 -0.754,2.677 -2.222,2.677 -2.372,2.827 -2.372,3.677 -2.274,3.776
  region net VIN: -5.691,3.927 -4.826,3.927 -4.71,3.81 -4.71,2.913 -4.859,2.763 -5.713,2.763 -5.852,2.902 -5.852,3.765
  region net SGND: -18.222,3.809 -19.613,3.809 -20.025,4.222 -20.025,4.863 cw(c-17.634,4.863) -19.325,6.553 cw(c-19.106,6.335) -19.106,6.644 -18.102,6.644 -17.889,6.431 -17.889,4.143
Signal Layer 2:
  rectangle net SGND: -2.766,4.762 -0.51,6.645
  region net VOUT1: -0.117,1.961 -3.463,1.961 -3.704,1.72 -3.704,0.906 -3.548,0.75 -0.117,0.75
  region net SGND: -18.515,3.896 -19.713,3.896 -20.009,4.192 -20.009,5.095 cw(c-18.088,5.095) -19.446,6.454 cw(c-18.98,5.987) -18.98,6.647 -18.185,6.647 cw(c-18.185,6.37) -17.908,6.37 -17.908,4.503 cw(c-18.515,4.503)
Bottom Layer:
  rectangle net SWCLK1: 1.402,1.877 2.594,2.428
  rectangle net SDA: 1.402,5.082 2.594,5.634
  rectangle net SCL: 1.402,3.482 2.594,4.034
  region net VIN: -0.049,4.061 -5.675,4.061 -5.973,3.763 -5.973,2.767 -5.761,2.555 -0.049,2.555
  region net VIN: -11.02,5.149 -10.679,4.808 -10.679,3.144 -10.182,2.647 -10.182,1.713 -10.623,1.273 -12.29,1.273 -13.578,2.561 -13.578,4.848 -13.277,5.149
  region net VDS: -19.75,-5.338 -18.262,-5.338 -16.896,-3.972 -16.896,-2.557 -17.456,-1.997 -19.471,-1.997 -20.062,-2.589 -20.062,-5.025

## Silkscreen, mask and mechanical layers (free items; w line width, h text height)
Top Overlay:
  circle w0.1: c-9.037,3.767 r0.65
  circle w0.1: c-9.037,3.767 r0.225
  circle w0.05: c-9.037,3.767 r1.591
  circle w0.1: c-9.037,3.767 r0.9
  lines w0.1: -16.595,4.208 cw(c-16.594,4.583) -16.594,4.958 ; -15.152,-24.971 -15.153,-26.175 -13.953,-26.175 -13.952,-24.972 ; -15.152,-24.375 -15.151,-23.175 -13.951,-23.175 -13.952,-24.376 ; -15.141,-3.571 -15.141,-4.775 -13.941,-4.775 -13.941,-3.572 ; -15.14,-2.975 -15.14,-1.775 -13.94,-1.775 -13.94,-2.975 ; -12.904,-16.076 -12.904,-21.276 -4.504,-21.276 -4.504,-16.076 ; -11.704,-21.276 -11.704,-20.476 -5.704,-20.476 -5.704,-21.276 ; -9.037,3.767 -8.812,3.767 ; -4.152,-24.977 -4.153,-26.181 -2.953,-26.181 -2.952,-24.978 ; -4.152,-24.381 -4.151,-23.181 -2.951,-23.181 -2.952,-24.381 ; -4.141,-3.577 -4.141,-4.781 -2.941,-4.781 -2.941,-3.578 ; -4.14,-2.981 -4.14,-1.781 -2.94,-1.781 -2.94,-2.981 ; -0.287,2.516 -17.787,2.526 ccw(c-17.788,1.626) -18.688,1.626 -18.705,-29.574 ccw(c-17.805,-29.574) -17.805,-30.474 -0.305,-30.484 ccw(c-0.305,-29.584) 0.595,-29.584 0.596,-28.437 ; 0.596,-23.283 0.608,-0.25 ; -18.845,4.209 cw(c-18.844,4.584) -18.844,4.959 -18.594,4.959 cw(c-18.594,4.584) -18.595,4.209 -18.845,4.209
Bottom Overlay:
  lines w0.1: -18.726,0.326 2.851,0.326 ; -18.725,1.326 2.851,1.326 ; -3.999,-31.286 -3.999,7.686 ; 0.051,-23.283 0.051,-0.25 ; 1.051,-23.283 1.051,-0.25 ; 1.96,-30.788 1.96,8.184 ; 2.851,-1.595 2.851,-0.595 ; 2.96,-30.788 2.96,8.184
Top Solder:
  rectangle: -16.429,6.184 -5.509,7.334
  rectangle: -16.014,1.028 -10.713,5.582
Bottom Solder:
  rectangle: -14.804,5.682 -4.658,7.305